# Altium PCB Kintex7_BaseC接口PCB.PcbDoc
Units mil, origin at the board's own origin, x right, y up, seen from the top; angles counter-clockwise.
Board outline 7012.95 x 4262.9 mil, 12 copper layers (Top1, Signal Layer 2, Signal Layer 3, Signal Layer 4, Signal Layer 5, Signal Layer 6, Signal Layer 7, Signal Layer 8, Signal Layer 9, Signal Layer 10, Signal Layer 11, Bottom 12), stack 59.645 mil thick; 35 components, 524 nets, 610 pads, 2 vias.
Unrouted connection lines stored in the file: 271.
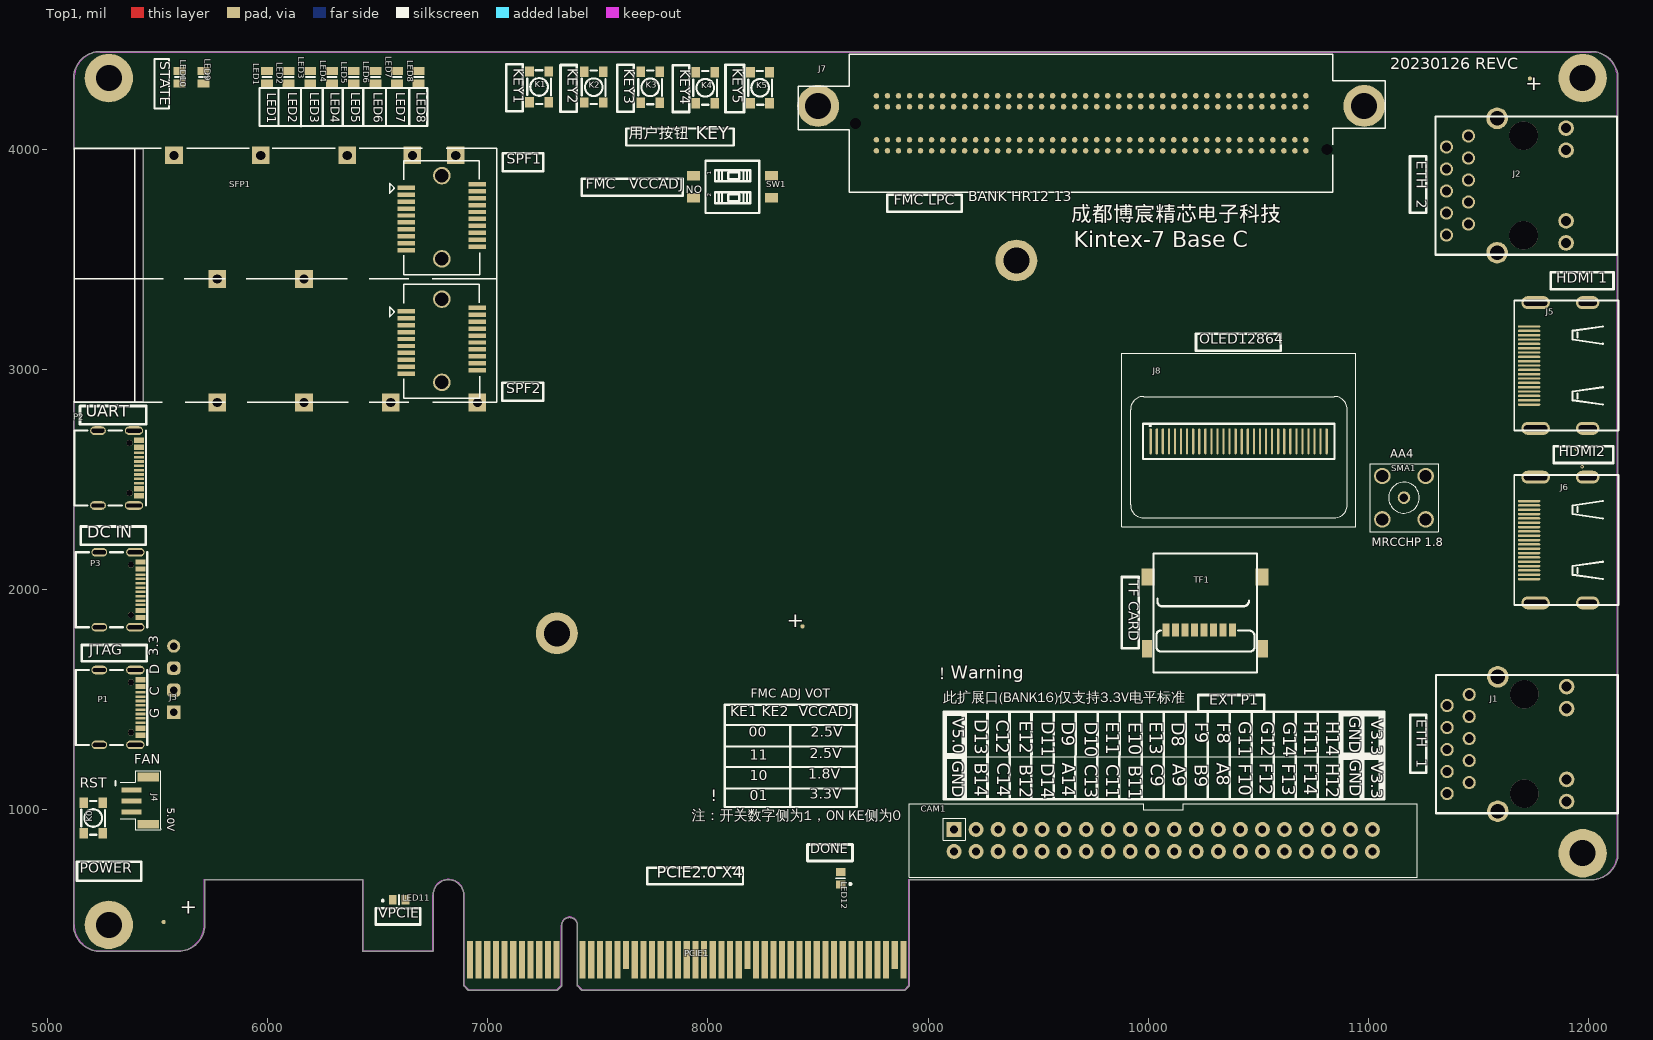
[diagram p0: Top1 view]
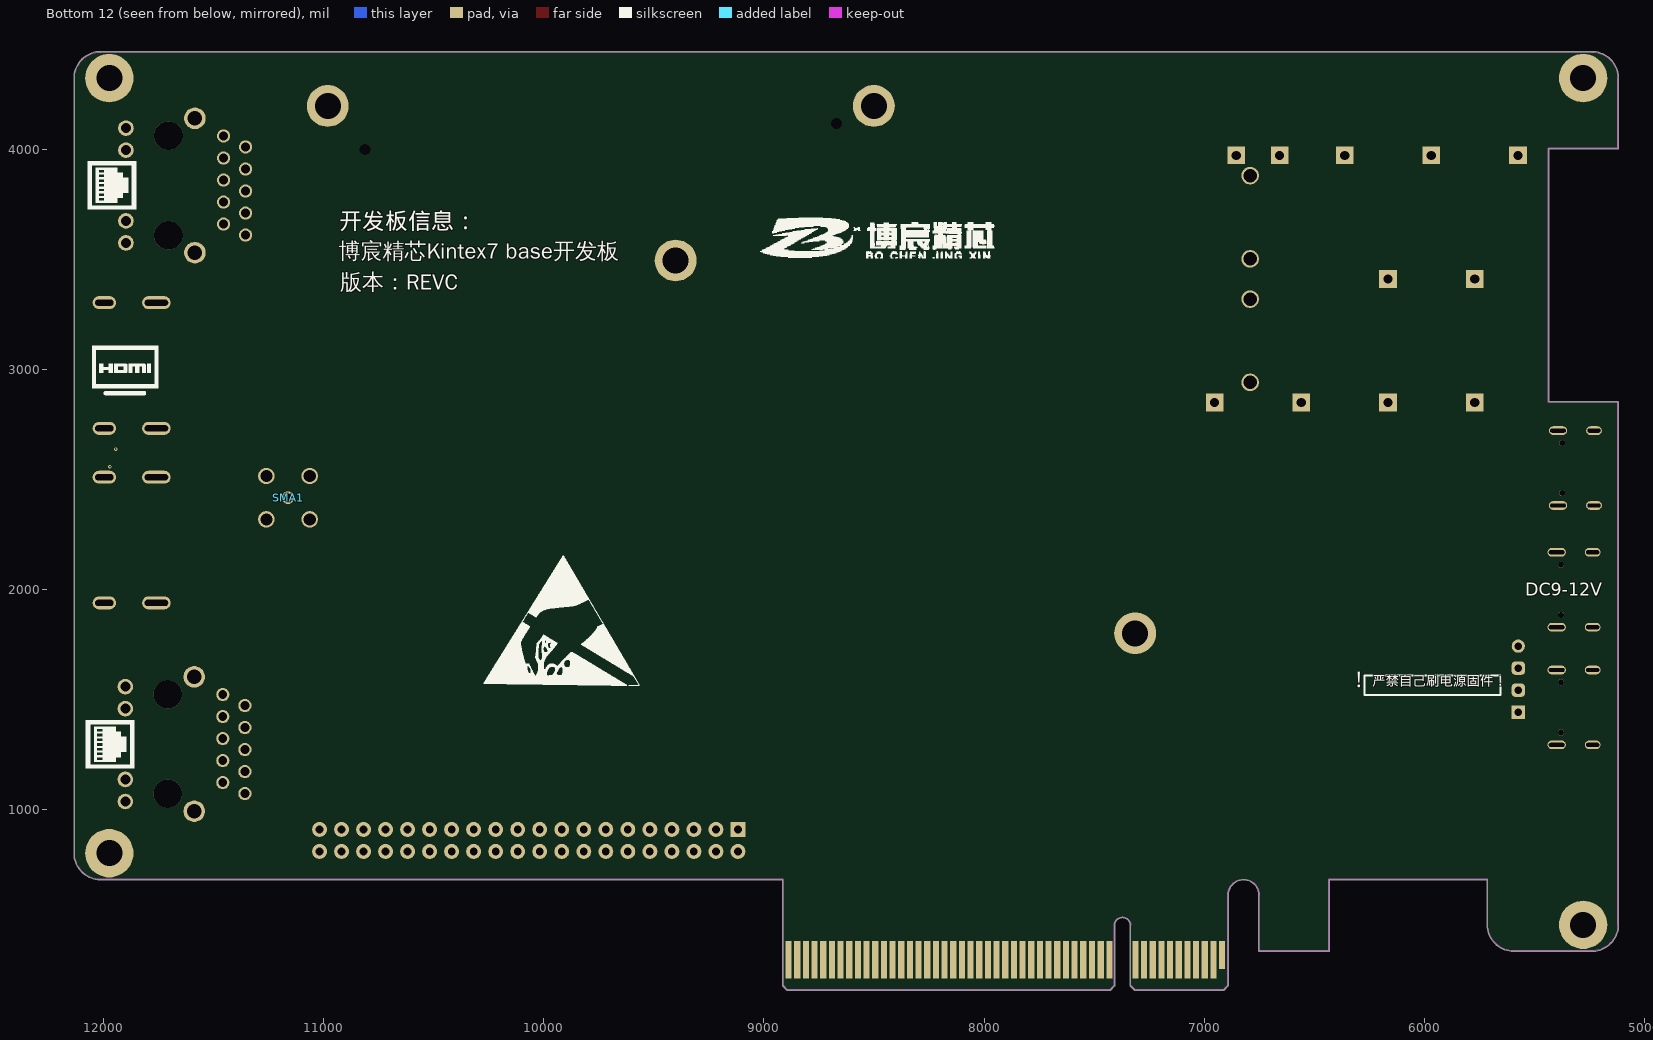
[diagram p1: Bottom 12 view, seen from below]

## Layer stack, top to bottom
Top Solder: solder mask 0.4, Solder Resist, Dk 3.5
Top1: signal copper 1.3779
Dielectric 1: core 3.0315, FR-4, Dk 4.2
Signal Layer 2: signal copper 0.6889
Dielectric 2: prepreg 3.937, Dk 4.2
Signal Layer 3: signal copper 0.6889
Dielectric 3: core 6.063, Dk 4.2
Signal Layer 4: signal copper 0.6889
Dielectric 4: prepreg 3.937, Dk 4.2
Signal Layer 5: signal copper 0.6889
Dielectric 5: core 6.063, Dk 4.2
Signal Layer 6: signal copper 0.6889
Dielectric 7: prepreg 3.937, Dk 4.2
Signal Layer 7: signal copper 0.6889
Dielectric 8: core 6.063, Dk 4.2
Signal Layer 8: signal copper 0.6889
Dielectric 9: prepreg 3.937, Dk 4.2
Signal Layer 9: signal copper 0.6889
Dielectric 10: core 6.063, Dk 4.2
Signal Layer 10: signal copper 0.6889
Dielectric 11: prepreg 3.937, Dk 4.2
Signal Layer 11: signal copper 0.6889
Dielectric 12: core 3.0315, Dk 4.2
Bottom 12: signal copper 1.3779
Bottom Solder: solder mask 0.4, Solder Resist, Dk 3.5

## Board outline
5243.8,356.86 ccw(c5243.73,359.37) 5244.04,356.87 5595.22,356.87 ccw(c5595.22,359.39) 5595.39,356.88 ccw(c5595.11,477.51) 5715.24,466.57 ccw(c5713.18,468.01) 5715.69,468.01 5715.69,474.37 ccw(c5595.11,477.51) 5715.74,477.51 ccw(c5595.11,477.51) 5715.69,480.64 5715.69,681.87 6432.66,681.87 6432.66,359.39 ccw(c6435.18,359.39) 6435.18,356.87 6750.18,356.87 ccw(c6750.18,359.39) 6752.69,359.39 6752.69,612.39 cw(c6822.18,612.39) 6891.66,612.39 6891.66,202.39 ccw(c6894.18,202.39) 6892.4,200.61 6912.4,180.61 ccw(c6914.18,182.39) 6914.18,179.88 7314.68,179.88 ccw(c7314.68,182.39) 7316.46,180.61 7336.46,200.61 ccw(c7334.68,202.39) 7337.19,202.39 7337.19,475.89 cw(c7372.18,475.89) 7407.16,475.89 7407.16,202.39 ccw(c7409.68,202.39) 7407.9,200.61 7427.9,180.61 ccw(c7429.68,182.39) 7429.68,179.88 8893.18,179.88 ccw(c8893.18,182.39) 8894.96,180.61 8914.96,200.61 ccw(c8913.18,202.39) 8915.69,202.39 8915.69,681.87 12014.96,681.87 ccw(c12014.96,684.39) 12015.51,681.94 ccw(c12012.32,802.52) 12132.95,802.52 ccw(c12012.32,802.52) 12132.91,805.66 12132.91,4319.05 ccw(c12130.39,4319.05) 12132.88,4319.4 ccw(c12012.29,4322.15) 12132.91,4322.15 ccw(c12012.29,4322.15) 12012.4,4442.77 ccw(c12012.4,4440.26) 12012.4,4442.77 5240.5,4442.77 ccw(c5240.5,4440.26) 5240.5,4442.77 ccw(c5240.61,4322.15) 5120.03,4319.01 ccw(c5240.61,4322.15) 5120.03,4318.98 5120.03,4319.05 5120.03,4003.1 ccw(c5122.54,4003.1) 5123.62,4000.83 ccw(c5123.97,4003.32) 5123.97,4000.8 5435.75,4000.8 5435.75,2851.79 5122.52,2851.79 cw(c5122.52,2849.28) 5122.52,2851.79 cw(c5122.52,2849.28) 5122.52,2851.79 ccw(c5122.52,2849.28) 5120,2849.28 5120,477.33 ccw(c5122.52,477.33) 5120,477.33 ccw(c5240.63,477.44)

## Design rules (kind name [scope] priority, off if disabled: settings)
AssemblyTestPointUsage [All] p1 off:
AssemblyTestpoint [All] p1 off: testpointundercomponent=TRUE minsize=40 maxsize=100 preferedsize=60 minholesize=0 maxholesize=40 preferedholesize=32 testpointgrid=1 usegrid=TRUE gridtolerance=0.01 allowsidetop=TRUE allowsidebottom=TRUE
Clearance Clearance_1 [IsTrack vs IsVia] p1: gap=5.1 ignorepadtopadclearanceinfootprint=FALSE
Clearance [All] p2: gap=4 ignorepadtopadclearanceinfootprint=FALSE
ComponentClearance [All] p1 off: gap=10 collisioncheckmode=3 verticalgap=10 showdistances=FALSE
DiffPairsRouting [All] p1 off: maxlimit=10 minlimit=10 mostfreqgap=10 toplayer_minwidth=15 toplayer_maxwidth=15 toplayer_prefwidth=15 midlayer1_minwidth=15 midlayer1_maxwidth=15 midlayer1_prefwidth=15 midlayer2_minwidth=15 midlayer2_maxwidth=15 midlayer2_prefwidth=15 midlayer3_minwidth=15 midlayer3_maxwidth=15 midlayer3_prefwidth=15 midlayer4_minwidth=15 midlayer4_maxwidth=15 midlayer4_prefwidth=15 midlayer5_minwidth=15 midlayer5_maxwidth=15 midlayer5_prefwidth=15 midlayer6_minwidth=15 midlayer6_maxwidth=15 midlayer6_prefwidth=15 midlayer7_minwidth=15 midlayer7_maxwidth=15 midlayer7_prefwidth=15 midlayer8_minwidth=15 midlayer8_maxwidth=15 midlayer8_prefwidth=15 midlayer9_minwidth=15 midlayer9_maxwidth=15 midlayer9_prefwidth=15 midlayer10_minwidth=15 midlayer10_maxwidth=15 midlayer10_prefwidth=15 bottomlayer_minwidth=15 bottomlayer_maxwidth=15 bottomlayer_prefwidth=15 maxuncoupledlength=500
FabricationTestPointUsage [All] p1 off: valid=0 allowmultiple=FALSE
FabricationTestpoint [All] p1 off: side=3 testpointundercomponent=TRUE minsize=40 maxsize=100 preferedsize=60 minholesize=0 maxholesize=40 preferedholesize=32 testpointgrid=1 allowsidetop=TRUE allowsidebottom=TRUE usegrid=TRUE gridtolerance=0.01
FanoutControl Fanout_BGA [IsBGA] p1 off: bgadir=Out bgaviamode=Centered fanoutstyle=Auto fanoutdirection=Alternating viagrid=1 // Fanout_BGA (Default Rule)
FanoutControl Fanout_LCC [IsLCC] p2 off: bgadir=Out bgaviamode=Centered fanoutstyle=Auto fanoutdirection=Alternating viagrid=1 // Fanout_LCC (Default Rule)
FanoutControl Fanout_SOIC [IsSOIC] p3 off: bgadir=Out bgaviamode=Centered fanoutstyle=Auto fanoutdirection=Alternating viagrid=1 // Fanout_SOIC (Default Rule)
FanoutControl Fanout_Small [(CompPinCount < 5)] p4 off: bgadir=Out bgaviamode=Centered fanoutstyle=Auto fanoutdirection=OutThenIn viagrid=1 // Fanout_Small (Default Rule)
FanoutControl Fanout_Default [All] p5 off: bgadir=Out bgaviamode=Centered fanoutstyle=Auto fanoutdirection=Alternating viagrid=1 // Fanout_Default (Default Rule)
Height [All] p1 off: minheight=0 maxheight=1000 prefheight=500
HoleSize [All] p1 off: absolutevalues=TRUE maxlimit=100 minlimit=1 maxpercent=80.000 minpercent=20.000
HoleToHoleClearance [All] p1 off: gap=10 allowstackedmicrovias=TRUE
LayerPairs [All] p1 off: enforce=TRUE
MinimumSolderMaskSliver [All] p1 off: minsoldermaskwidth=10
NetAntennae [All] p1 off: netantennaetolerance=0
PasteMaskExpansion [All] p1 off: expansion=0
PlaneConnect [All] p1: planeconnectstyle=Direct reliefexpansion=20 reliefentries=4 reliefconductorwidth=10 reliefairgap=10
PolygonConnect [All] p1: connectstyle=Direct reliefconductorwidth=10 reliefentries=4 polygonreliefangle="90 Angle" airgapwidth=10
RoutingCorners [All] p1 off: cornerstyle=45-Degree minsetback=100 maxsetback=100
RoutingLayers [All] p1 off: top layer_v5=TRUE mid layer 1_v5=TRUE mid layer 2_v5=TRUE mid layer 3_v5=TRUE mid layer 4_v5=TRUE mid layer 5_v5=TRUE mid layer 6_v5=TRUE mid layer 7_v5=TRUE mid layer 8_v5=TRUE mid layer 9_v5=TRUE mid layer 10_v5=TRUE bottom layer_v5=TRUE
RoutingPriority [All] p1 off: routingpriority=0
RoutingTopology [All] p1 off: topology=Shortest
RoutingVias [All] p1: holewidth=7.87 width=15.75 viastyle="Through Hole" minholewidth=7.87 minwidth=15.75 maxholewidth=196.85 maxwidth=196.85
SilkToSilkClearance [All] p1 off: silktosilkclearance=10
SilkToSolderMaskClearance [IsPad] p1 off: minsilkscreentomaskgap=10 clearancetoexposedcopper=TRUE
SolderMaskExpansion [All] p1 off: expansion=4
UnpouredPolygon [All] p1 off:
Width [All] p1: maxlimit=15 minlimit=3.5 preferedwidth=3.9 toplayer_prefwidth=3.5 midlayer1_maxwidth=10 midlayer2_maxwidth=10 midlayer3_maxwidth=10 midlayer4_maxwidth=10 midlayer5_maxwidth=10 midlayer6_maxwidth=10 midlayer7_maxwidth=10 midlayer8_maxwidth=10 midlayer9_maxwidth=10 midlayer10_maxwidth=10 bottomlayer_prefwidth=3.5 minimp=0.000000 maximp=1000.000000 favimp=50.000000
4 further rules are at their usual default settings.

## Classes and differential pairs
component class 01XC7K325T_POWER: LED11 P3
component class 03XC7K325T_EXT_MCU: J3 J4 K0 LED9 LED10 SW1
component class 04XC7K325T_IO_BANK: SMA1
component class 05XC7K325T_MEMORY: TF1
component class 06XC7K325T_DEBUG: LED12 P1 P2
component class 07XC7K325T_HDMI: J5 J6
component class 08XC7K325T_PCIE: PCIE1
component class 09XC7K325T_SFP: SFP1
component class 10XC7K325T_ETH_PHY: J1 J2
component class 11XC7K325T_IO: CAM1 K1 K2 K3 K4 K5 LED1 LED2 LED3 LED4 LED5 LED6 LED7 LED8
component class 12XC7K325T_FMC_LPC: J7
component class 13OLED: J8

## Components (designator, comment, footprint, x,y, rotation, side; value= is the part's Value field where it differs from the comment)
CAM1 "40针双排" 40针双排座 10157.28,885.42 r0 top
J1 "HR911130A" HR911130A 11704.16,1299.97 r0 top
J2 "HR911130A" HR911130A 11701.16,3836.2 r0 top
J3 "NC" 4针 5574.56,1642.96 r270 top
J4 "3针接口" GH1.25-3P 5411.47,1039.4 r270 top
J5 "HDMI" HDMI贴片#1 11759,2730.62 r90 top
J6 "HDMI" HDMI贴片#2 11908.5,2219.93 r0 top
J7 "ASP_134603-1" ASP-134603-01 9798.91,4123.15 r0 top
J8 "SSD1306" OLED096 10400.29,2721.42 r0 top
K0 "按键" KARBS 5209.1,962.42 r270 top
K1 "按键" KARBS 7233.86,4282.32 r90 top
K2 "按键" KARBS 7481.86,4281.32 r90 top
K3 "按键" KARBS 7738.55,4280.32 r90 top
K4 "按键" KARBS 7988.23,4278.32 r90 top
K5 "按键" KARBS 8237.22,4278.43 r90 top
LED1 "B" 0805#1 5998.13,4299.01 r90 top
LED2 "B" 0805#1 6096.56,4299.01 r90 top
LED3 "B" 0805#1 6194.98,4299.01 r90 top
LED4 "B" 0805#1 6293.56,4299.01 r90 top
LED5 "B" 0805#1 6391.98,4299.01 r90 top
LED6 "B" 0805#1 6490.41,4299.01 r90 top
LED7 "B" 0805#1 6588.56,4299.01 r90 top
LED8 "B" 0805#1 6686.98,4299.01 r90 top
LED9 "Y" 0805#1 5709.27,4299.01 r90 top
LED10 "B" 0805#1 5601.27,4299.01 r90 top
LED11 "Y" 0805#2 6625.79,590.43 r180 top
LED12 "B" 0805#2 8603.3,716.77 r270 top
P1 "TYPE-C16PIN" TYPE-C 5349.9,1479.99 r270 top
P2 "TYPE-C16PIN" TYPE-C 5343.9,2567.21 r270 top
P3 "TYPE-C16PIN" TYPE-C 5349.9,2014.59 r270 top
PCIE1 "NC" PCIE_8LANE_EDGE 7904.15,433.91 r0 top
SFP1 "SFPX2" SFP2 6161.12,3401.84 r0 top
SMA1 "SMA" SMA立式 11161.76,2417.37 r180 bottom
SW1 "DM-02-V-T/R" 2.54两段拨码开关 8133.97,3815 r270 top
TF1 "TF_Card" 翻盖式TF卡座 10232.66,1889 r0 top

## Footprints (in the part's own frame and the unit in brackets; to place one, negate y for a bottom-side part, rotate by r counter-clockwise, add the part's x,y. Pads: shape width x height; smd on the part's side, far side on the other; paste and mask are expansions set on the pad)
2.54两段拨码开关 [mm]
  rect 1.1x1.5 smd: 1(-1.624,-5.061) 2(0.916,-5.061) 3(0.916,3.939) 4(-1.624,3.939)
  silkscreen extent -3.36,-3.66 2.66,2.54
4针 [mil]
  round 60 hole 33: 1(-100,0)
  rrect50% 60x60 hole 33: 2(0,0) 3(100,0)
  rect 60x60 hole 33: 4(200,0)
40针双排座 [mil]
  rect 68x68 hole 35: 1(-1039,25)
  round 68 hole 35: 2(-939,25) 3(-839,25) 4(-739,25) 5(-639,25) 6(-539,25) 7(-439,25) 8(-339,25) 9(-239,25) 10(-139,25) 11(-39,25) 12(61,25) 13(161,25) 14(261,25) 15(361,25) 16(461,25) 17(561,25) 18(661,25) 19(761,25) 20(861,25) 21(861,-75) 22(761,-75) 23(661,-75) 24(561,-75) 25(461,-75) 26(361,-75) 27(261,-75) 28(161,-75) 29(61,-75) 30(-39,-75) 31(-139,-75) 32(-239,-75) 33(-339,-75) 34(-439,-75) 35(-539,-75) 36(-639,-75) 37(-739,-75) 38(-839,-75) 39(-939,-75) 40(-1039,-75)
  silkscreen extent -1243,-192 1065,142
0805#1 [mm]
  rect 0.9x1.37 smd: 1(-0.025,0) 2(1.429,0)
  silkscreen extent 0.71,-0.56 0.71,0.53, body extent -0.29,-0.65 1.71,0.6, height 0.9
0805#2 [mm]
  rect 0.9x1.1 smd: 1(-0.025,0) 2(1.429,0)
  silkscreen extent 0.71,-0.56 0.71,0.53, body extent -0.29,-0.65 1.71,0.6, height 0.9
ASP-134603-01 [mil]
  round 25 smd: C1(917,-131) C2(867,-131) C3(817,-131) C4(767,-131) C5(717,-131) C6(667,-131) C7(617,-131) C8(567,-131) C9(517,-131) C10(467,-131) C11(417,-131) C12(367,-131) C13(317,-131) C14(267,-131) C15(217,-131) C16(167,-131) C17(117,-131) C18(67,-131) C19(17,-131) C20(-33,-131) C21(-83,-131) C22(-133,-131) C23(-183,-131) C24(-233,-131) C25(-283,-131) C26(-333,-131) C27(-383,-131) C28(-433,-131) C29(-483,-131) C30(-533,-131) C31(-583,-131) C32(-633,-131) C33(-683,-131) C34(-733,-131) C35(-783,-131) C36(-833,-131) C37(-883,-131) C38(-933,-131) C39(-983,-131) C40(-1033,-131) D1(917,-81) D2(867,-81) D3(817,-81) D4(767,-81) D5(717,-81) D6(667,-81) D7(617,-81) D8(567,-81) D9(517,-81) D10(467,-81) D11(417,-81) D12(367,-81) D13(317,-81) D14(267,-81) D15(217,-81) D16(167,-81) D17(117,-81) D18(67,-81) D19(17,-81) D20(-33,-81) D21(-83,-81) D22(-133,-81) D23(-183,-81) D24(-233,-81) D25(-283,-81) D26(-333,-81) D27(-383,-81) D28(-433,-81) D29(-483,-81) D30(-533,-81) D31(-583,-81) D32(-633,-81) D33(-683,-81) D34(-733,-81) D35(-783,-81) D36(-833,-81) D37(-883,-81) D38(-933,-81) D39(-983,-81) D40(-1033,-81) G1(917,69) G2(867,69) G3(817,69) G4(767,69) G5(717,69) G6(667,69) G7(617,69) G8(567,69) G9(517,69) G10(467,69) G11(417,69) G12(367,69) G13(317,69) G14(267,69) G15(217,69) G16(167,69) G17(117,69) G18(67,69) G19(17,69) G20(-33,69) G21(-83,69) G22(-133,69) G23(-183,69) G24(-233,69) G25(-283,69) G26(-333,69) G27(-383,69) G28(-433,69) G29(-483,69) G30(-533,69) G31(-583,69) G32(-633,69) G33(-683,69) G34(-733,69) G35(-783,69) G36(-833,69) G37(-883,69) G38(-933,69) G39(-983,69) G40(-1033,69) H1(917,119) H2(867,119) H3(817,119) H4(767,119) H5(717,119) H6(667,119) H7(617,119) H8(567,119) H9(517,119) H10(467,119) H11(417,119) H12(367,119) H13(317,119) H14(267,119) H15(217,119) H16(167,119) H17(117,119) H18(67,119) H19(17,119) H20(-33,119) H21(-83,119) H22(-133,119) H23(-183,119) H24(-233,119) H25(-283,119) H26(-333,119) H27(-383,119) H28(-433,119) H29(-483,119) H30(-533,119) H31(-583,119) H32(-633,119) H33(-683,119) H34(-733,119) H35(-783,119) H36(-833,119) H37(-883,119) H38(-933,119) H39(-983,119) H40(-1033,119)
  round 190 hole 118.11: S1(-1297.8,72.8) S2(1181.8,72.8)
  round 0 hole 50: ""(-1128.5,-6) ""(1012.5,-126)
  silkscreen extent -1388,-320 1276,308
GH1.25-3P [mil]
  rect 39.37x98.43 smd: 0(-109.4,47) 0(104.8,47)
  rect 24x90 smd: 1(49.8,-29) 2(-0.2,-29) 3(-50.2,-29)
  silkscreen extent -137,-80 131,104
HDMI贴片#1 [mm]
  oval 0.28x2.6 smd: 1(11.779,0.758) 2(11.279,0.758) 3(10.778,0.758) 4(10.278,0.758) 5(9.778,0.758) 6(9.277,0.758) 7(8.779,0.758) 8(8.279,0.758) 9(7.779,0.758) 10(7.278,0.758) 11(6.778,0.758) 12(6.278,0.758) 13(5.78,0.758) 14(5.279,0.758) 15(4.779,0.758) 16(4.279,0.758) 17(3.778,0.758) 18(3.278,0.758) 19(2.777,0.758)
  oval 1.5x2.7 hole 0.699 slot 2.1 at 90 deg: 20(14.527,-6.001) 21(0.029,-6.001)
  oval 1.5x3.3 hole 0.699 slot 2.7 at 90 deg: 22(14.527,-0.002) 23(0.029,-0.002)
  silkscreen extent -0.22,-9.55 14.78,2.46
HDMI贴片#2 [mm]
  oval 2.6x0.28 smd: 1(-4.555,4.619) 2(-4.555,4.119) 3(-4.555,3.619) 4(-4.555,3.118) 5(-4.555,2.618) 6(-4.555,2.118) 7(-4.555,1.62) 8(-4.555,1.119) 9(-4.555,0.619) 10(-4.555,0.119) 11(-4.555,-0.382) 12(-4.555,-0.882) 13(-4.555,-1.38) 14(-4.555,-1.88) 15(-4.555,-2.381) 16(-4.555,-2.881) 17(-4.555,-3.382) 18(-4.555,-3.882) 19(-4.555,-4.382)
  oval 2.7x1.5 hole 0.699 slot 2.1 at 0 deg: 20(2.204,7.368) 21(2.204,-7.131)
  oval 3.3x1.5 hole 0.699 slot 2.7 at 0 deg: 22(-3.796,7.368) 23(-3.796,-7.131)
  silkscreen extent -6.26,-7.38 5.75,7.62
HR911130A [mil]
  round 70.87 hole 45: 11(196,-262.54) 12(196,-162.54) 13(196,159.12) 14(196,259.12)
  round 98 hole 66: 15(-116.99,-306.83) 16(-116.99,303.41)
  round 129.92 hole 129.92: 17(3.08,-227.69) 18(3.08,224.27)
  round 60 hole 40: P1(-346.92,-226.71) P2(-246.92,-176.71) P3(-346.92,-126.71) P4(-246.92,-76.71) P5(-346.92,-26.71) P6(-246.92,23.29) P7(-346.92,73.29) P8(-246.92,123.29) P9(-346.92,173.29) P10(-246.92,223.29)
  silkscreen extent -397,-316 428,312
KARBS [mm]
  rect 1.2x1 smd: 1(-1.778,1.1) 1(1.778,1.1) 2(-1.778,-1.1) 2(1.778,-1.1)
  silkscreen extent -1.96,-1.37 1.93,1.37
OLED096 [mm]
  oval 0.254x3 smd: 1(-9.883,-1.23) 2(-9.183,-1.23) 3(-8.483,-1.23) 4(-7.783,-1.23) 5(-7.083,-1.23) 6(-6.383,-1.23) 7(-5.683,-1.23) 8(-4.983,-1.23) 9(-4.283,-1.23) 10(-3.583,-1.23) 11(-2.883,-1.23) 12(-2.183,-1.23) 13(-1.483,-1.23) 14(-0.783,-1.23) 15(-0.083,-1.23) 16(0.617,-1.23) 17(1.317,-1.23) 18(2.017,-1.23) 19(2.717,-1.23) 20(3.417,-1.23) 21(4.117,-1.23) 22(4.817,-1.23) 23(5.517,-1.23) 24(6.217,-1.23) 25(6.917,-1.23) 26(7.617,-1.23) 27(8.317,-1.23) 28(9.017,-1.23) 29(9.717,-1.23) 30(10.417,-1.23)
  silkscreen extent -13.21,-11.06 13.79,8.94
PCIE_8LANE_EDGE [mil]
  rect 28x126 smd far side: A1(-984.25,-93.98)
  rect 28x169 smd far side: A2(-944.88,-115.48) A3(-905.51,-115.48) A4(-866.14,-115.48) A5(-826.77,-115.48) A6(-787.4,-115.48) A7(-748.03,-115.48) A8(-708.66,-115.48) A9(-669.29,-115.48) A10(-629.92,-115.48) A11(-590.55,-115.48) A12(-472.44,-115.48) A13(-433.07,-115.48) A14(-393.7,-115.48) A15(-354.33,-115.48) A16(-314.96,-115.48) A17(-275.59,-115.48) A18(-236.22,-115.48) A19(-196.85,-115.48) A20(-157.48,-115.48) A21(-118.11,-115.48) A22(-78.74,-115.48) A23(-39.37,-115.48) A24(0,-115.48) A25(39.37,-115.48) A26(78.74,-115.48) A27(118.11,-115.48) A28(157.48,-115.48) A29(196.85,-115.48) A30(236.22,-115.48) A31(275.59,-115.48) A32(314.96,-115.48) A33(354.33,-115.48) A34(393.7,-115.48) A35(433.07,-115.48) A36(472.44,-115.48) A37(511.81,-115.48) A38(551.18,-115.48) A39(590.55,-115.48) A40(629.92,-115.48) A41(669.29,-115.48) A42(708.66,-115.48) A43(748.03,-115.48) A44(787.4,-115.48) A45(826.77,-115.48) A46(866.14,-115.48) A47(905.51,-115.48) A48(944.88,-115.48) A49(984.25,-115.48)
  rect 28x169 smd: B1(-984.25,-115.48) B2(-944.88,-115.48) B3(-905.51,-115.48) B4(-866.14,-115.48) B5(-826.77,-115.48) B6(-787.4,-115.48) B7(-748.03,-115.48) B8(-708.66,-115.48) B9(-669.29,-115.48) B10(-629.92,-115.48) B11(-590.55,-115.48) B12(-472.44,-115.48) B13(-433.07,-115.48) B14(-393.7,-115.48) B15(-354.33,-115.48) B16(-314.96,-115.48) B18(-236.22,-115.48) B19(-196.85,-115.48) B20(-157.48,-115.48) B21(-118.11,-115.48) B22(-78.74,-115.48) B23(-39.37,-115.48) B24(0,-115.48) B25(39.37,-115.48) B26(78.74,-115.48) B27(118.11,-115.48) B28(157.48,-115.48) B29(196.85,-115.48) B30(236.22,-115.48) B32(314.96,-115.48) B33(354.33,-115.48) B34(393.7,-115.48) B35(433.07,-115.48) B36(472.44,-115.48) B37(511.81,-115.48) B38(551.18,-115.48) B39(590.55,-115.48) B40(629.92,-115.48) B41(669.29,-115.48) B42(708.66,-115.48) B43(748.03,-115.48) B44(787.4,-115.48) B45(826.77,-115.48) B46(866.14,-115.48) B47(905.51,-115.48) B49(984.25,-115.48)
  rect 28x126 smd: B17(-275.59,-93.98) B31(275.59,-93.98) B48(944.88,-93.98)
SFP2 [mil]
  rect 80x80 hole 42: 9(-388.37,-552.56) 9(5.33,-552.56) 9(399.03,-552.56) 9(792.73,-552.56) 13(-388.37,8.46) 13(5.33,8.46) 17(-585.22,569.48) 18(-191.52,569.48) 19(202.18,569.48) 19(497.46,569.48) 19(694.31,569.48)
  rect 80x20 smd: A1(469.9,422.63) A2(469.9,391.13) A3(469.9,359.64) A4(469.9,328.14) A5(469.9,296.65) A6(469.9,265.15) A7(469.9,233.65) A8(469.9,202.16) A9(469.9,170.66) A10(469.9,139.17) A11(792.73,154.91) A12(792.73,186.41) A13(792.73,217.91) A14(792.73,249.4) A15(792.73,280.9) A16(792.73,312.39) A17(792.73,343.89) A18(792.73,375.39) A19(792.73,406.88) A20(792.73,438.38) B1(469.9,-138.39) B2(469.9,-169.89) B3(469.9,-201.38) B4(469.9,-232.88) B5(469.9,-264.37) B6(469.9,-295.87) B7(469.9,-327.37) B8(469.9,-358.86) B9(469.9,-390.36) B10(469.9,-421.85) B11(792.73,-406.11) B12(792.73,-374.61) B13(792.73,-343.11) B14(792.73,-311.62) B15(792.73,-280.12) B16(792.73,-248.63) B17(792.73,-217.13) B18(792.73,-185.63) B19(792.73,-154.14) B20(792.73,-122.64)
  round 80 hole 62: ""(631.32,-461.22) ""(631.32,-83.27) ""(631.32,99.8) ""(631.32,477.75)
  silkscreen extent -1038,-553 881,601, body extent 415,-518 841,531, height 150
SMA立式 [mm]
  round 1.45 hole 0.98: 1(0.011,-0.009)
  round 1.9 hole 1.4: 2(-2.489,-2.509) 2(-2.489,2.491) 2(2.511,-2.509) 2(2.511,2.491)
  body extent -3.24,-3.26 3.26,3.24, height 10.2
TYPE-C [mm]
  oval 1x2.1 hole 0.445 slot 1.8 at 90 deg: 1(-3.926,1.279) 2(4.714,1.279)
  oval 1x1.8 hole 0.445 slot 1.5 at 90 deg: 3(-3.926,-2.87) 4(4.714,-2.87)
  rect 0.6x1.15 smd: A1B12(-2.806,1.855) A4B9(-2.006,1.855) B1A12(3.594,1.855) B4A9(2.794,1.855)
  rect 0.3x1.15 smd: A5(-0.856,1.855) A6(0.144,1.855) A7(0.644,1.855) A8(-1.356,1.855) B5(2.144,1.855) B6(1.144,1.855) B7(-0.356,1.855) B8(1.644,1.855)
  round 0.686 hole 0.686 unplated: ""(-2.496,0.78) ""(3.284,0.78)
  silkscreen extent -3.92,-5.59 4.71,2.67
翻盖式TF卡座 [mil]
  rect 47.24x78.74 smd: 0(-238.17,-158.63) 0(287.43,-158.63)
  rect 59.06x78.74 smd: 0(283.49,168.15) 9(-234.23,168.15)
  rect 31.5x60 smd: 1(150.61,-73) 2(107.31,-73) 3(64,-73) 4(20.69,-73) 5(-22.61,-73) 6(-65.92,-73) 7(-109.23,-73) 8(-152.53,-73)
  silkscreen extent -209,-265 261,275

## Part data
J3: library part 4端头
J5 J6: library part MINI_HDMI
J7: library part ASP_134604-1
J8: library part OLED
LED1 LED2 LED3 LED4 LED5 LED6 LED7 LED8 LED9 LED10 LED11 LED12: library part LED1, "Typical RED GaAs LED", LatestRevisionDate=08-Jul-2005, LatestRevisionNote="Mech Layer 1 removed.", PackageDescription="LED; 2 Leads", PackageReference=LED-1, Published=8-Jun-2000, Publisher="Altium Limited"
P1 P2 P3: BOM_Manufacturer="SHOU HAN", BOM_Manufacturer Part=TYPE-C16PIN, BOM_Supplier=LCSC, BOM_Supplier Part=C393939, Contributor=LCSC, spicePre=U
PCIE1: library part PCIex4
SMA1: library part SMA-2, "SMA-2"
SW1: BOM_Manufacturer=Diptronics, BOM_Manufacturer Part=DM-02-V-T/R, BOM_Supplier=LCSC, BOM_Supplier Part=C225004, Contributor=LCSC, spicePre=S
TF1: library part TF

## Free pads (board coordinates)
  round 190 hole 118.11: 2(7314.48,1801.14) 2(9401.09,3494.06)
  round 220 hole 118.11: 6(11972.91,4322.15) 6(11972.91,802.5) 7(5280,4322.15) 8(5280,477.5)
  round 19 smd: 9(5528.97,490) 9(8429.97,1832.48) 9(11732.97,4320)

## Via types
v1: diameter 15.75, hole 7.87, Top1 to Bottom 12, tented both sides, 2 vias

## Nets (pads, with @x,y where several pads share a name; then routed paths per layer and width w, separated by ;. In a path a pad name is that pad's centre, name@x,y a point inside that pad or via, vN(x,y) a via of type N, cw(c..) or ccw(c..) an arc to the next point about the centre after c; other vN are vias at no path point)
3.3V_PCIE: PCIE1.A9 PCIE1.A10 PCIE1.B8
12V_PCIE: PCIE1.A2 PCIE1.A3 PCIE1.B1 PCIE1.B2 PCIE1.B3
ADJ_VOT_SET1: SW1.1
ADJ_VOT_SET2: SW1.2
B116_REFCLKN1: J7.D5
B116_REFCLKP1: J7.D4
B116_RXN2: J7.C7
B116_RXP2: J7.C6
B116_TXN2: J7.C3
B116_TXP2: J7.C2
CLK_50M: 
DBU_USBDM: P1.A7 P1.B7
DBU_USBDP: P1.A6 P1.B6
DC_EN1V0: 
DC_EN1V5: 
DC_EN1V8: 
DC_EN3V3: 
DC_ENADJ: 
DC_ENMGTAVCC: 
DC_ENMGTAVTT: 
DDR3_VREF: 
DDR3_VTT: 
DDR31_A0: 
DDR31_A1: 
DDR31_A2: 
DDR31_A3: 
DDR31_A4: 
DDR31_A5: 
DDR31_A6: 
DDR31_A7: 
DDR31_A8: 
DDR31_A9: 
DDR31_A10: 
DDR31_A11: 
DDR31_A12: 
DDR31_A13: 
DDR31_A14: 
DDR31_BA0: 
DDR31_BA1: 
DDR31_BA2: 
DDR31_CKE: 
DDR31_CLK_N: 
DDR31_CLK_P: 
DDR31_DM0: 
DDR31_DM1: 
DDR31_DM2: 
DDR31_DM3: 
DDR31_DQ0: 
DDR31_DQ1: 
DDR31_DQ2: 
DDR31_DQ3: 
DDR31_DQ4: 
DDR31_DQ5: 
DDR31_DQ6: 
DDR31_DQ7: 
DDR31_DQ8: 
DDR31_DQ9: 
DDR31_DQ10: 
DDR31_DQ11: 
DDR31_DQ12: 
DDR31_DQ13: 
DDR31_DQ14: 
DDR31_DQ15: 
DDR31_DQ16: 
DDR31_DQ17: 
DDR31_DQ18: 
DDR31_DQ19: 
DDR31_DQ20: 
DDR31_DQ21: 
DDR31_DQ22: 
DDR31_DQ23: 
DDR31_DQ24: 
DDR31_DQ25: 
DDR31_DQ26: 
DDR31_DQ27: 
DDR31_DQ28: 
DDR31_DQ29: 
DDR31_DQ30: 
DDR31_DQ31: 
DDR31_DQS0_N: 
DDR31_DQS0_P: 
DDR31_DQS1_N: 
DDR31_DQS1_P: 
DDR31_DQS2_N: 
DDR31_DQS2_P: 
DDR31_DQS3_N: 
DDR31_DQS3_P: 
DDR31_nCAS: 
DDR31_nCS: 
DDR31_nRAS: 
DDR31_nRESET: 
DDR31_nWE: 
DDR31_ODT: 
DEBUG_INIT_B: 
DEBUG_PROG_B: 
ETH1_1V0: 
ETH1_1V8: 
ETH1_3V3: 
ETH2_1V0: 
ETH2_1V8: 
ETH2_3V3: 
FAN_CTRL: 
FLASH_CE: 
FLASH_CLK: 
FLASH_D0: 
FLASH_D1: 
FLASH_D2: 
FLASH_D3: 
FMC_CLKN0: J7.H5
FMC_CLKN1: J7.G3
FMC_CLKP0: J7.H4
FMC_CLKP1: J7.G2
FMC_LN00: J7.G7
FMC_LN01: J7.D9
FMC_LN02: J7.H8
FMC_LN03: J7.G10
FMC_LN04: J7.H11
FMC_LN05: J7.D12
FMC_LN06: J7.C11
FMC_LN07: J7.H14
FMC_LN08: J7.G13
FMC_LN09: J7.D15
FMC_LN10: J7.C15
FMC_LN11: J7.H17
FMC_LN12: J7.G16
FMC_LN13: J7.D18
FMC_LN14: J7.C19
FMC_LN15: J7.H20
FMC_LN16: J7.G19
FMC_LN17: J7.D21
FMC_LN18: J7.C23
FMC_LN19: J7.H23
FMC_LN20: J7.G22
FMC_LN21: J7.H26
FMC_LN22: J7.G25
FMC_LN23: J7.D24
FMC_LN24: J7.H29
FMC_LN25: J7.G28
FMC_LN26: J7.D27
FMC_LN27: J7.C27
FMC_LN28: J7.H32
FMC_LN29: J7.G31
FMC_LN30: J7.H35
FMC_LN31: J7.G34
FMC_LN32: J7.H38
FMC_LN33: J7.G37
FMC_LP00: J7.G6
FMC_LP01: J7.D8
FMC_LP02: J7.H7
FMC_LP03: J7.G9
FMC_LP04: J7.H10
FMC_LP05: J7.D11
FMC_LP06: J7.C10
FMC_LP07: J7.H13
FMC_LP08: J7.G12
FMC_LP09: J7.D14
FMC_LP10: J7.C14
FMC_LP11: J7.H16
FMC_LP12: J7.G15
FMC_LP13: J7.D17
FMC_LP14: J7.C18
FMC_LP15: J7.H19
FMC_LP16: J7.G18
FMC_LP17: J7.D20
FMC_LP18: J7.C22
FMC_LP19: J7.H22
FMC_LP20: J7.G21
FMC_LP21: J7.H25
FMC_LP22: J7.G24
FMC_LP23: J7.D23
FMC_LP24: J7.H28
FMC_LP25: J7.G27
FMC_LP26: J7.D26
FMC_LP27: J7.C26
FMC_LP28: J7.H31
FMC_LP29: J7.G30
FMC_LP30: J7.H34
FMC_LP31: J7.G33
FMC_LP32: J7.H37
FMC_LP33: J7.G36
FMC_PG: J7.D1
FMC_PRSTN: J7.H2
FMC_SCL: J7.C30
FMC_SDA: J7.C31
FMC_TCK: J7.D29
FMC_TDI: J7.D30
FMC_TDO: J7.D31
FMC_TMS: J7.D33
FMC_VREF: J7.H1
FPGA_DONE: LED12.1
FPGA_I2C_SCL1: 
FPGA_I2C_SCL3: 
FPGA_I2C_SDA1: 
FPGA_I2C_SDA3: 
FT_OSC_N: 
FT_OSC_P: 
GND: CAM1.19 CAM1.22 CAM1.40 J1.12 J1.15 J1.16 J1.P10 J2.12 J2.15 J2.16 J2.P10 J3.4 J5.2 J5.5 J5.8 J5.11 J5.17 J5.20 J5.21 J5.22 J5.23 J6.2 J6.5 J6.8 J6.11 J6.17 J6.20 J6.21 J6.22 J6.23 J7.C1 J7.C4 J7.C5 J7.C8 J7.C9 J7.C12 J7.C13 J7.C16 J7.C17 J7.C20 J7.C21 J7.C24 J7.C25 J7.C28 J7.C29 J7.C32 J7.C33 J7.C34 J7.C36 J7.C38 J7.C40 J7.D2 J7.D3 J7.D6 J7.D7 J7.D10 J7.D13 J7.D16 J7.D19 J7.D22 J7.D25 J7.D28 J7.D35 J7.D37 J7.D39 J7.G1 J7.G4 J7.G5 J7.G8 J7.G11 J7.G14 J7.G17 J7.G20 J7.G23 J7.G26 J7.G29 J7.G32 J7.G35 J7.G38 J7.G40 J7.H3 J7.H6 J7.H9 J7.H12 J7.H15 J7.H18 J7.H21 J7.H24 J7.H27 J7.H30 J7.H33 J7.H36 J7.H39 J7.S1 J7.S2 J8.1 J8.8 J8.10 J8.11 J8.12 J8.13 J8.16 J8.17 J8.21 J8.22 J8.23 J8.24 J8.25 J8.29 J8.30 K0.2 K1.2 K2.2 K3.2 K4.2 K5.2 LED1.2 LED2.2 LED3.2 LED4.2 LED5.2 LED6.2 LED7.2 LED8.2 LED9.2 LED10.2 LED11.2 P1.1 P1.2 P1.3 P1.4 P1.A1B12 P1.A5 P1.B1A12 P1.B5 P2.1 P2.2 P2.3 P2.4 P2.A1B12 P2.A5 P2.B1A12 P2.B5 P3.1 P3.2 P3.3 P3.4 P3.A1B12 P3.A5 P3.B1A12 P3.B5 pad.2 pad.6 pad.7 pad.8 PCIE1.A4 PCIE1.A12 PCIE1.A15 PCIE1.A18 PCIE1.A20 PCIE1.A23 PCIE1.A24 PCIE1.A27 PCIE1.A28 PCIE1.A31 PCIE1.A34 PCIE1.A37 PCIE1.A38 PCIE1.A41 PCIE1.A42 PCIE1.A45 PCIE1.A46 PCIE1.A49 PCIE1.B4 PCIE1.B7 PCIE1.B13 PCIE1.B16 PCIE1.B18 PCIE1.B21 PCIE1.B22 PCIE1.B25 PCIE1.B26 PCIE1.B29 PCIE1.B32 PCIE1.B35 PCIE1.B36 PCIE1.B39 PCIE1.B40 PCIE1.B43 PCIE1.B44 PCIE1.B47 PCIE1.B49 SFP1. SFP1.9 SFP1.13 SFP1.17 SFP1.18 SFP1.19 SFP1.A1 SFP1.A9 SFP1.A10 SFP1.A11 SFP1.A14 SFP1.A17 SFP1.A20 SFP1.B1 SFP1.B9 SFP1.B10 SFP1.B11 SFP1.B14 SFP1.B17 SFP1.B20 SMA1.2 SW1.3 SW1.4 TF1.0 TF1.6 TF1.9
GTX_CLK156P25_N: 
GTX_CLK156P25_P: 
HDMI1_CLK_N: J5.12
HDMI1_CLK_P: J5.10
HDMI1_DATA0_N: J5.9
HDMI1_DATA0_P: J5.7
HDMI1_DATA1_N: J5.6
HDMI1_DATA1_P: J5.4
HDMI1_DATA2_N: J5.3
HDMI1_DATA2_P: J5.1
HDMI1_HPD: 
HDMI1_I2C_SCL: 
HDMI1_I2C_SDA: 
HDMI1_OUT_EN: 
HDMI2_CLK_N: J6.12
HDMI2_CLK_P: J6.10
HDMI2_DATA0_N: J6.9
HDMI2_DATA0_P: J6.7
HDMI2_DATA1_N: J6.6
HDMI2_DATA1_P: J6.4
HDMI2_DATA2_N: J6.3
HDMI2_DATA2_P: J6.1
JTAG_TCK: 
JTAG_TDI: 
JTAG_TDO: 
JTAG_TMS: 
KEY1: K1.1
KEY2: K2.1
KEY3: K3.1
KEY4: K4.1
KEY5: K5.1
LED1: 
LED2: 
LED3: 
LED4: 
LED5: 
LED6: 
LED7: 
LED8: 
MCU_LED1: 
MCU_LED2: 
MGTAVCC: 
MGTAVTT: 
MRCC_CLK1: SMA1.1
NetC10_1: 
NetC11_1: 
NetC12_2: 
NetC28_1: J1.P1
NetC30_2: 
NetC31_2: 
NetC45_1: J2.P1
NetC47_2: 
NetC48_2: 
NetC49_2: 
NetC51_2: PCIE1.A13
NetC52_2: PCIE1.A14
NetC53_2: PCIE1.A16
NetC54_2: PCIE1.A17
NetC55_2: PCIE1.A21
NetC56_2: PCIE1.A22
NetC57_2: PCIE1.A25
NetC58_2: PCIE1.A26
NetC59_2: PCIE1.A29
NetC60_2: PCIE1.A30
NetC61_1: 
NetC61_2: 
NetC74_2: 
NetC77_2: 
NetC94_1: 
NetC95_2: 
NetC110_2: 
NetC112_2: 
NetC141_2: 
NetC143_2: 
NetC188_2: 
NetC190_2: 
NetC233_2: 
NetC235_2: 
NetC236_2: 
NetC249_2: 
NetC250_1: 
NetC251_1: 
NetC251_2: 
NetC252_2: 
NetC266_1: 
NetC267_1: 
NetC271_2: 
NetC277_1: 
NetC278_2: 
NetC279_2: SFP1.A16
NetC281_2: SFP1.A15
NetC283_2: SFP1.B16
NetC285_2: SFP1.B15
NetC287_2: 
NetC288_2: 
NetC291_2: J8.28
NetC292_1: J8.5
NetC292_2: J8.4
NetC293_1: J8.3
NetC293_2: J8.2
NetC294_2: J8.27
NetD1_1: J4.2
NetD3_2: J6.18
NetD4_1: P3.A4B9 P3.B4A9
NetIR2_2: 
NetIR3_2: 
NetIR4_2: 
NetJ1_11: J1.11
NetJ1_14: J1.14
NetJ2_11: J2.11
NetJ2_14: J2.14
NetJ5_13: J5.13
NetJ5_15: J5.15
NetJ5_16: J5.16
NetJ5_19: J5.19
NetJ6_13: J6.13
NetJ8_26: J8.26
NetL2_1: 
NetL3_1: 
NetL4_1: 
NetL5_1: 
NetL6_1: 
NetL7_1: 
NetLED1_1: LED1.1
NetLED2_1: LED2.1
NetLED3_1: LED3.1
NetLED4_1: LED4.1
NetLED5_1: LED5.1
NetLED6_1: LED6.1
NetLED7_1: LED7.1
NetLED8_1: LED8.1
NetLED9_1: LED9.1
NetLED10_1: LED10.1
NetLED11_1: LED11.1
NetLED12_2: LED12.2
NetPR9_5: 
NetPR9_7: 
NetPR10_5: 
NetPR10_6: 
NetPR10_7: 
NetPR10_8: 
NetPR11_6: 
NetPR11_7: 
NetPR11_8: 
NetPR26_2: SFP1.A4
NetPR26_3: SFP1.A5
NetPR26_4: SFP1.A6
NetPR27_2: SFP1.B4
NetPR27_3: SFP1.B5
NetPR27_4: SFP1.B6
NetQ1_2: 
NetR1_2: 
NetR3_1: 
NetR4_1: 
NetR5_1: 
NetR9_2: 
NetR11_2: 
NetR12_2: 
NetR21_1: 
NetR23_1: 
NetR35_1: 
NetR37_1: 
NetR42_1: 
NetR47_1: 
NetR50_2: 
NetR59_2: 
NetR78_1: 
NetR80_2: 
NetR82_1: 
NetR84_2: 
NetR92_2: 
NetR93_2: 
NetR94_2: 
NetR95_1: 
OLED_D0: J8.18
OLED_D1: J8.19
OLED_DC: J8.15
OLED_RST: J8.14
PA13: J3.2
PA14: J3.3
PCIE_CLK_N: 
PCIE_CLK_P: 
PCIE_RESET: PCIE1.A11
PCIE_RX0_N: PCIE1.B15
PCIE_RX0_P: PCIE1.B14
PCIE_RX1_N: PCIE1.B20
PCIE_RX1_P: PCIE1.B19
PCIE_RX2_N: PCIE1.B24
PCIE_RX2_P: PCIE1.B23
PCIE_RX3_N: PCIE1.B28
PCIE_RX3_P: PCIE1.B27
PCIE_TX0_N: 
PCIE_TX0_P: 
PCIE_TX1_N: 
PCIE_TX1_P: 
PCIE_TX2_N: 
PCIE_TX2_P: 
PCIE_TX3_N: 
PCIE_TX3_P: 
PG1V0: 
PHY1_LED0: J1.13
PHY1_LED1: 
PHY1_MDC: 
PHY1_MDI0_N: J1.P3
PHY1_MDI0_P: J1.P2
PHY1_MDI1_N: J1.P7
PHY1_MDI1_P: J1.P4
PHY1_MDI2_N: J1.P6
PHY1_MDI2_P: J1.P5
PHY1_MDI3_N: J1.P9
PHY1_MDI3_P: J1.P8
PHY1_MDIO: 
PHY1_nINT: 
PHY1_nRST: 
PHY1_RX_CLK: 
PHY1_RXCTL: 
PHY1_RXD0: 
PHY1_RXD1: 
PHY1_RXD2: 
PHY1_RXD3: 
PHY1_TX_CLK: 
PHY1_TXCTL: 
PHY1_TXD0: 
PHY1_TXD1: 
PHY1_TXD2: 
PHY1_TXD3: 
PHY2_LED0: J2.13
PHY2_LED1: 
PHY2_MDC: 
PHY2_MDI0_N: J2.P3
PHY2_MDI0_P: J2.P2
PHY2_MDI1_N: J2.P7
PHY2_MDI1_P: J2.P4
PHY2_MDI2_N: J2.P6
PHY2_MDI2_P: J2.P5
PHY2_MDI3_N: J2.P9
PHY2_MDI3_P: J2.P8
PHY2_MDIO: 
PHY2_nINT: 
PHY2_nRST: 
PHY2_RX_CLK: 
PHY2_RXCTL: 
PHY2_RXD0: 
PHY2_RXD1: 
PHY2_RXD2: 
PHY2_RXD3: 
PHY2_TX_CLK: 
PHY2_TXCTL: 
PHY2_TXD0: 
PHY2_TXD1: 
PHY2_TXD2: 
PHY2_TXD3: 
POWER_KEY: K0.1
PRSTN: PCIE1.A1 PCIE1.B17 PCIE1.B31 PCIE1.B48
SD_CLK: TF1.5
SD_CMD: TF1.3
SD_DATA0: TF1.7
SD_DATA1: TF1.8
SD_DATA2: TF1.1
SD_DATA3: TF1.2
SFP_LOSS1: SFP1.A8
SFP_LOSS2: SFP1.B8
SFP_RAT_S1: SFP1.A7
SFP_RAT_S2: SFP1.B7
SFP_RX_N1: SFP1.A12
SFP_RX_N2: SFP1.B12
SFP_RX_P1: SFP1.A13
SFP_RX_P2: SFP1.B13
SFP_TX_DIS1: SFP1.A3
SFP_TX_DIS2: SFP1.B3
SFP_TX_N1: SFP1.A19
SFP_TX_N2: SFP1.B19
SFP_TX_P1: SFP1.A18
SFP_TX_P2: SFP1.B18
TDO_TDI: 
TTL1: CAM1.2
TTL2: CAM1.39
TTL3: CAM1.3
TTL4: CAM1.38
TTL5: CAM1.4
TTL6: CAM1.37
TTL7: CAM1.5
TTL8: CAM1.36
TTL9: CAM1.6
TTL10: CAM1.35
TTL11: CAM1.7
TTL12: CAM1.34
TTL13: CAM1.8
TTL14: CAM1.33
TTL15: CAM1.9
TTL16: CAM1.32
TTL17: CAM1.10
TTL18: CAM1.31
TTL19: CAM1.11
TTL20: CAM1.30
TTL21: CAM1.12
TTL22: CAM1.29
TTL23: CAM1.13
TTL24: CAM1.28
TTL25: CAM1.14
TTL26: CAM1.27
TTL27: CAM1.15
TTL28: CAM1.26
TTL29: CAM1.16
TTL30: CAM1.25
TTL31: CAM1.17
TTL32: CAM1.24
TTL33: CAM1.18
TTL34: CAM1.23
UART_RXD: 
UART_TXD: 
UART_USBDM: P2.A7 P2.B7
UART_USBDP: P2.A6 P2.B6
VCC5.0: CAM1.1 J4.1
VCC12: J7.C35 J7.C37
VCC_1V0: 
VCC_1V5: 
VCC_1V8: 
VCC_3V3: CAM1.20 CAM1.21 J7.C39 J7.D32 J7.D36 J7.D38 J7.D40 J8.6 J8.9 TF1.4
VCC_ADJ: J7.G39 J7.H40
VCC_FT3V3: 
VCC_HDMI1: J5.18
VCC_HDMI1_OUT: 
VDD_MCU: J3.1
VOT1V8_REF: 
VOT2V5_REF: 
VOT3V3_REF: 
pads on no net: J1.17 J1.18 J2.17 J2.18 J4.0 J4.3 J5.14 J6.14 J6.15 J6.16 J6.19 J7. J7.D34 J8.7 J8.20 P1. P1.A4B9 P1.A8 P1.B4A9 P1.B8 P2. P2.A4B9 P2.A8 P2.B4A9 P2.B8 P3. P3.A6 P3.A7 P3.A8 P3.B6 P3.B7 P3.B8 PCIE1.A5 PCIE1.A6 PCIE1.A7 PCIE1.A8 PCIE1.A19 PCIE1.A32 PCIE1.A33 PCIE1.A35 PCIE1.A36 PCIE1.A39 PCIE1.A40 PCIE1.A43 PCIE1.A44 PCIE1.A47 PCIE1.A48 PCIE1.B5 PCIE1.B6 PCIE1.B9 PCIE1.B10 PCIE1.B11 PCIE1.B12 PCIE1.B30 PCIE1.B33 PCIE1.B34 PCIE1.B37 PCIE1.B38 PCIE1.B41 PCIE1.B42 PCIE1.B45 PCIE1.B46 SFP1.A2 SFP1.B2
copper on no net:
  other v1: 11970,2558 11944,2638.03

## Keep-outs
Keep-Out Layer:
  lines w5: 5122.54,4003.1 5122.54,4319.05 cw(c5240.61,4322.15) 5240.5,4440.26 8649.57,4440.26 ; 5123.97,4003.32 5438.27,4003.32 5438.27,2849.28 5122.52,2849.28 ; 5713.18,468.01 5713.18,684.39 6435.18,684.39 6435.18,359.39 6750.18,359.39 6750.18,612.39 ; 5713.18,480.61 cw(c5595.11,477.51) 5595.22,359.4 5243.73,359.39 cw(c5240.63,477.44) 5122.52,477.33 5122.52,2849.28 ; 8507.29,4440.26 12012.4,4440.26 cw(c12012.29,4322.15) 12130.36,4319.05 12130.39,799.82 ; 12012.43,684.41 ccw(c12012.32,802.52) 12130.39,805.62 ; 12014.96,684.39 10272.18,684.39 8913.18,684.39 8913.18,202.39 8893.18,182.39 7429.68,182.39 7409.68,202.39 7409.68,475.89 ; 5122.52,2849.28 5122.52,2849.28 ; 5122.52,2849.28 5122.52,2849.28 ; 6750.18,612.39 cw(c6822.18,612.39) 6894.18,612.39 ; 6750.18,612.39 cw(c6822.18,612.39) 6894.18,612.39 ; 6894.18,612.39 6894.18,202.39 6914.18,182.39 7314.68,182.39 7334.68,202.39 7334.68,475.89 ; 7334.68,475.89 cw(c7372.18,475.89) 7409.68,475.89 ; 7334.68,475.89 cw(c7372.18,475.89) 7409.68,475.89

## Silkscreen, mask and mechanical layers (free items; w line width, h text height)
Top Overlay:
  drawing of 162 lines, arcs and shapes, not listed
  text "STATE" at 5497.27,4398.6 h80 r270
  text "KEY1" at 7102.1,4367.43 h80 r270
  text "KEY5" at 8096.61,4367.43 h80 r270
  text "KEY2" at 7348.1,4366.43 h80 r270
  text "KEY3" at 7605.1,4364.43 h80 r270
  text "KEY4" at 7859.1,4363.43 h80 r270
  text "20230126 REVC" at 11100,4345 h90
  text "LED2" at 6080.27,4258 h69 r270
  text "LED3" at 6181.27,4258 h69 r270
  text "LED4" at 6275.27,4258 h69 r270
  text "LED5" at 6368.27,4258 h69 r270
  text "LED6" at 6470.27,4258 h69 r270
  text "LED7" at 6571.27,4258 h69 r270
  text "LED8" at 6664.77,4258.1 h69 r270
  text "LED1" at 5986.27,4255.7 h69 r270
  text "+" at 11712,4244 h118.11
  text "用户按钮" at 7640,4031 h85
  text "KEY" at 7946,4025 h100
  text "ETH" at 11203,3948 h80 r270
  text "SPF1" at 7086.8,3917.83 h80
  text "FMC   VCCADJ" at 7446,3805 h80
  text "2" at 11202.9,3770 h80 r270
  text "BANK HR12 13" at 9182,3747 h80
  text "FMC LPC" at 8844.7,3731.33 h80
  text "成都博宸精芯电子科技" at 9651,3650 h118.11
  text "Kintex-7 Base C" at 9662,3530 h125
  text "HDMI 1" at 11852,3377 h80
  text "OLED12864" at 10231.7,3099.09 h80
  text "SPF2" at 7084,2875.63 h80
  text "UART" at 5176,2767 h90
  text "HDMI2" at 11864.7,2589.36 h80
  text "AA4" at 11099,2584 h66
  text "DC IN" at 5183,2218 h90
  text "MRCCHP 1.8" at 11015,2182 h66
  text "TF CARD" at 9894.83,2041.71 h80 r270
  text "+" at 8358,1805 h118.11
  text "3.3" at 5521,1696 h75 r90
  text "JTAG" at 5191,1687 h80
  text "D" at 5525.9,1615.86 h75 r90
  text "！" at 9029.27,1575.5 h90
  text "Warning" at 9102.47,1575.5 h100
  text "C" at 5524.9,1516.91 h75 r90
  text "FMC ADJ VOT" at 8195,1496 h69
  text "此扩展口(BANK16)仅支持3.3V电平标准" at 9070,1473 h80
  text "EXT P1" at 10278,1460.09 h80
  text "GND" at 10894.9,1425.43 h90 r270
  text "V5.0" at 9093.9,1418.43 h90 r270
  text "G" at 5525.9,1414.86 h75 r90
  text "D13" at 9190.9,1411.43 h100 r270
  text "ETH" at 11203.9,1411.43 h80 r270
  text "V3.3" at 10994.9,1410.43 h90 r270
  text "C12" at 9289.9,1409.43 h100 r270
  text "KE1 KE2" at 8101,1409 h80
  text "VCCADJ" at 8414,1409 h80
  text "E12" at 9395.9,1403.43 h100 r270
  text "D11" at 9496.9,1402.43 h100 r270
  text "H11" at 10688.9,1402.43 h100 r270
  text "G11" at 10390.15,1402 h100 r270
  text "G12" at 10491.9,1401.43 h100 r270
  text "H14" at 10786.9,1401.43 h100 r270
  text "D9" at 9587.9,1400.43 h100 r270
  text "E13" at 9985.9,1400.43 h100 r270
  text "G14" at 10591.9,1400.43 h100 r270
  text "D10" at 9690.9,1399.43 h100 r270
  text "E11" at 9789.9,1398.43 h100 r270
  text "E10" at 9892,1398 h100 r270
  text "D8" at 10086.9,1397.43 h100 r270
  text "F9" at 10192.9,1397.43 h100 r270
  text "F8" at 10291.9,1395.43 h100 r270
  text "00" at 8187,1315 h80
  text "2.5V" at 8467,1315 h80
  text "1" at 11203.9,1228.43 h80 r270
  text "GND" at 10895.9,1226.43 h90 r270
  text "GND" at 9092,1222 h90 r270
  text "2.5V" at 8462,1218.28 h80
  text "A14" at 9588.9,1214.43 h100 r270
  text "B14" at 9191.9,1212.43 h100 r270
  text "C14" at 9292.9,1212.43 h100 r270
  text "A8" at 10290.9,1212.43 h100 r270
  text "V3.3" at 10994.9,1212.43 h90 r270
  text "11" at 8190,1212 h80
  text "D14" at 9493.9,1210.43 h100 r270
  text "F12" at 10485.9,1210.43 h100 r270
  text "F14" at 10688.9,1210.43 h100 r270
  text "H12" at 10788.9,1210.43 h100 r270
  text "F10" at 10389.9,1209.43 h100 r270
  text "F13" at 10587.9,1209.43 h100 r270
  text "C11" at 9789.9,1207.43 h100 r270
  text "C9" at 9991.9,1207.77 h100 r270
  text "A9" at 10089.9,1207.77 h100 r270
  text "B12" at 9395.9,1206.43 h100 r270
  text "C13" at 9691.9,1206.43 h100 r270
  text "B9" at 10190.9,1206.43 h100 r270
  text "B11" at 9890.9,1202.43 h100 r270
  text "FAN" at 5394.67,1193.7 h75
  text "1.8V" at 8457,1125 h80
  text "10" at 8190,1117 h80
  text "RST" at 5147,1083 h80
  text "3.3V" at 8462,1034 h80
  text "01" at 8191,1028 h80
  text "!" at 8013,1021 h90
  text "5.0V" at 5530.97,1009 h60 r270
  text "注：开关数字侧为1，ON KE侧为0" at 7928,936 h79
  text "DONE" at 8464.3,786.03 h75
  text "POWER" at 5149.07,698.22 h80
  text "PCIE2.0 X4" at 7768,673 h90
  text "+" at 5603,505 h118.11
  text "VPCIE" at 6504,493 h80
Bottom Overlay:
  drawing of 4471 lines, arcs and shapes, not listed
  text "开发板信息：" at 10929,3610 h130
  text "博宸精芯Kintex7 base开发板" at 10931,3478 h125
  text "版本：REVC" at 10925,3337 h125
  text "DC9-12V" at 5542,1951 h100
  text "严禁自己刷电源固件！" at 6238.1,1546.6 h77
  text "！" at 6345.9,1531 h121
Top Solder:
  circle w49.21: c5280.06,477.23 r84.65
  circle w49.21: c11973.32,4322.12 r84.65
  circle w49.21: c11972.82,802.73 r84.65
  circle w49.21: c5280.06,4321.91 r84.65
  rectangle: 6890.9,172.43 8919.9,402
  rectangle: 6435.98,360.79 6750.98,465.33
Bottom Solder:
  circle w49.21: c5280.06,477.23 r84.65
  circle w49.21: c11973.32,4322.12 r84.65
  circle w49.21: c11972.82,802.73 r84.65
  circle w49.21: c5280.06,4321.91 r84.65
  rectangle: 6890.9,170.43 8918.9,400.63
  rectangle: 6435.98,360.79 6750.98,465.33

## Text inside footprints (layer, text, board x,y; h text height)
J1: Mechanical 9 "17" at 11707.24,1052.28 h30 r270; Mechanical 9 "18" at 11707.24,1504.24 h30 r270
J2: Mechanical 9 "18" at 11704.24,4040.47 h30 r270; Mechanical 9 "17" at 11704.24,3588.51 h30 r270
J7: Mechanical 13 "S1" at 8501.11,4175.95 h30; Mechanical 13 "S2" at 10980.71,4175.95 h30
SFP1: Mechanical 8 "9" at 6611.02,3011.48 h30; Mechanical 8 "11" at 6913.85,2995.73 h30; Mechanical 8 "14" at 6913.85,3090.22 h30; Mechanical 8 "1" at 6611.02,3263.45 h30; Mechanical 8 "17" at 6913.85,3184.71 h30; Mechanical 8 "20" at 6913.85,3279.2 h30; Mechanical 8 "10" at 6591.02,2979.99 h30; Mechanical 8 "2" at 6611.02,3231.95 h30; Mechanical 8 "5" at 6611.02,3137.47 h30; Mechanical 8 "7" at 6611.02,3074.47 h30; Mechanical 8 "16" at 6913.85,3153.21 h30; Mechanical 8 "6" at 6611.02,3105.97 h30; Mechanical 8 "4" at 6611.02,3168.96 h30; Mechanical 8 "15" at 6913.85,3121.72 h30; Mechanical 8 "13" at 6913.85,3058.73 h30; Mechanical 8 "18" at 6913.85,3216.21 h30; Mechanical 8 "19" at 6913.85,3247.7 h30; Mechanical 8 "12" at 6913.85,3027.23 h30; Mechanical 8 "8" at 6611.02,3042.98 h30; Mechanical 8 "3" at 6611.02,3200.46 h30; Mechanical 8 "9" at 6611.02,3572.5 h30; Mechanical 8 "10" at 6591.02,3541.01 h30; Mechanical 8 "11" at 6913.85,3556.75 h30; Mechanical 8 "14" at 6913.85,3651.24 h30; Mechanical 8 "17" at 6913.85,3745.73 h30; Mechanical 8 "1" at 6611.02,3824.47 h30; Mechanical 8 "20" at 6913.85,3840.22 h30; Mechanical 8 "2" at 6611.02,3792.97 h30; Mechanical 8 "16" at 6913.85,3714.23 h30; Mechanical 8 "7" at 6611.02,3635.49 h30; Mechanical 8 "15" at 6913.85,3682.74 h30; Mechanical 8 "5" at 6611.02,3698.49 h30; Mechanical 8 "6" at 6611.02,3666.99 h30; Mechanical 8 "4" at 6611.02,3729.98 h30; Mechanical 8 "12" at 6913.85,3588.25 h30; Mechanical 8 "18" at 6913.85,3777.23 h30; Mechanical 8 "13" at 6913.85,3619.75 h30; Mechanical 8 "19" at 6913.85,3808.72 h30; Mechanical 8 "8" at 6611.02,3604 h30; Mechanical 8 "3" at 6611.02,3761.48 h30; Mechanical 8 "9" at 5565.9,2849.28 h30 r90; Mechanical 8 "13" at 5555.9,3410.3 h30 r90; Mechanical 8 "17" at 5555.9,3971.32 h30 r90; Mechanical 8 "10" at 5835.42,2849.28 h30 r90; Mechanical 8 "14" at 5835.42,3410.3 h30 r90; Mechanical 8 "18" at 5949.6,3971.32 h30 r90; Mechanical 8 "19" at 6343.3,3971.32 h30 r90; Mechanical 8 "11" at 6394.48,2849.28 h30 r90; Mechanical 8 "15" at 6394.48,3410.3 h30 r90; Mechanical 8 "12" at 6674.01,2849.28 h30 r90; Mechanical 8 "16" at 6674.01,3410.3 h30 r90; Mechanical 8 "20" at 6737,3971.32 h30 r90
SW1: Top Overlay "ON" at 7975.48,3846 h60 r180; Top Overlay "1" at 8021.73,3883.94 h30 r90; Top Overlay "2" at 8022.43,3783.77 h30 r89